# Altium PCB PCB1.PcbDoc
Units mm, origin at the board's own origin, x right, y up, seen from the top; angles counter-clockwise.
Board outline 90 x 60 mm, 2 copper layers (Top Layer, Bottom Layer); 43 components, 28 nets, 115 pads, 11 vias.
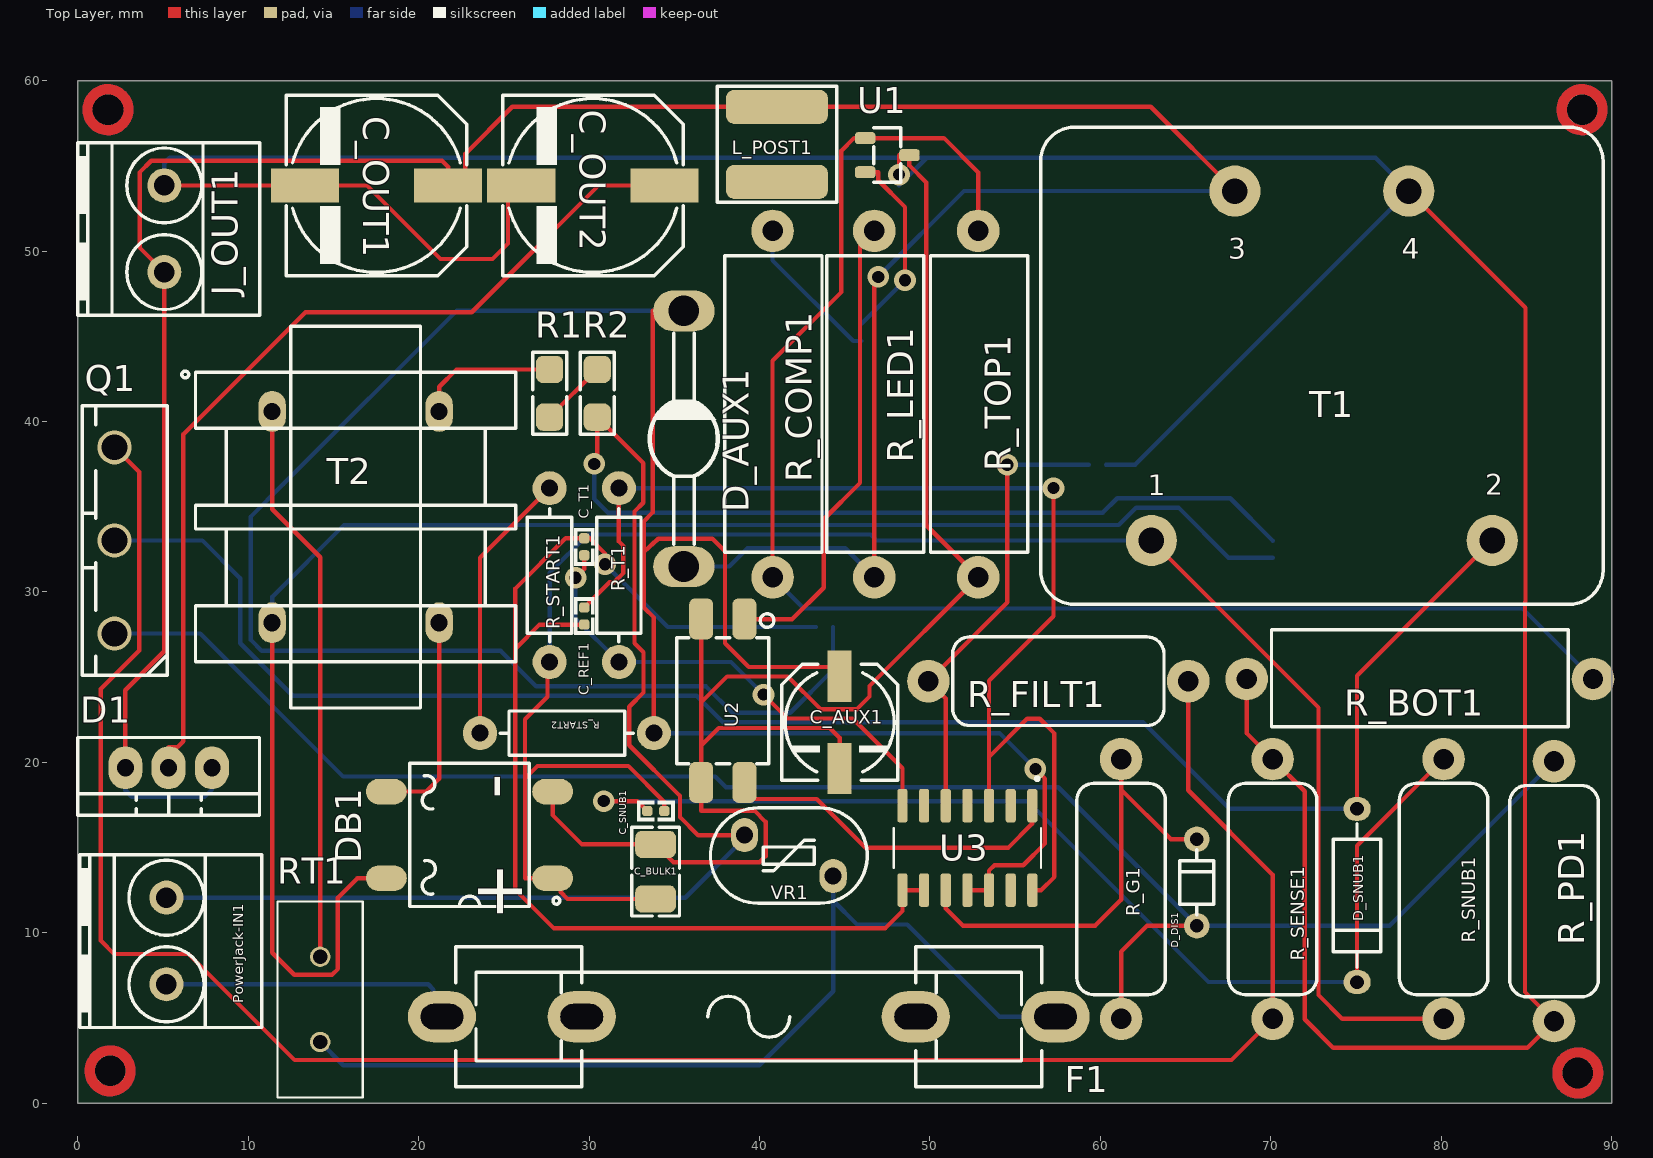
[diagram p0: Top Layer view]
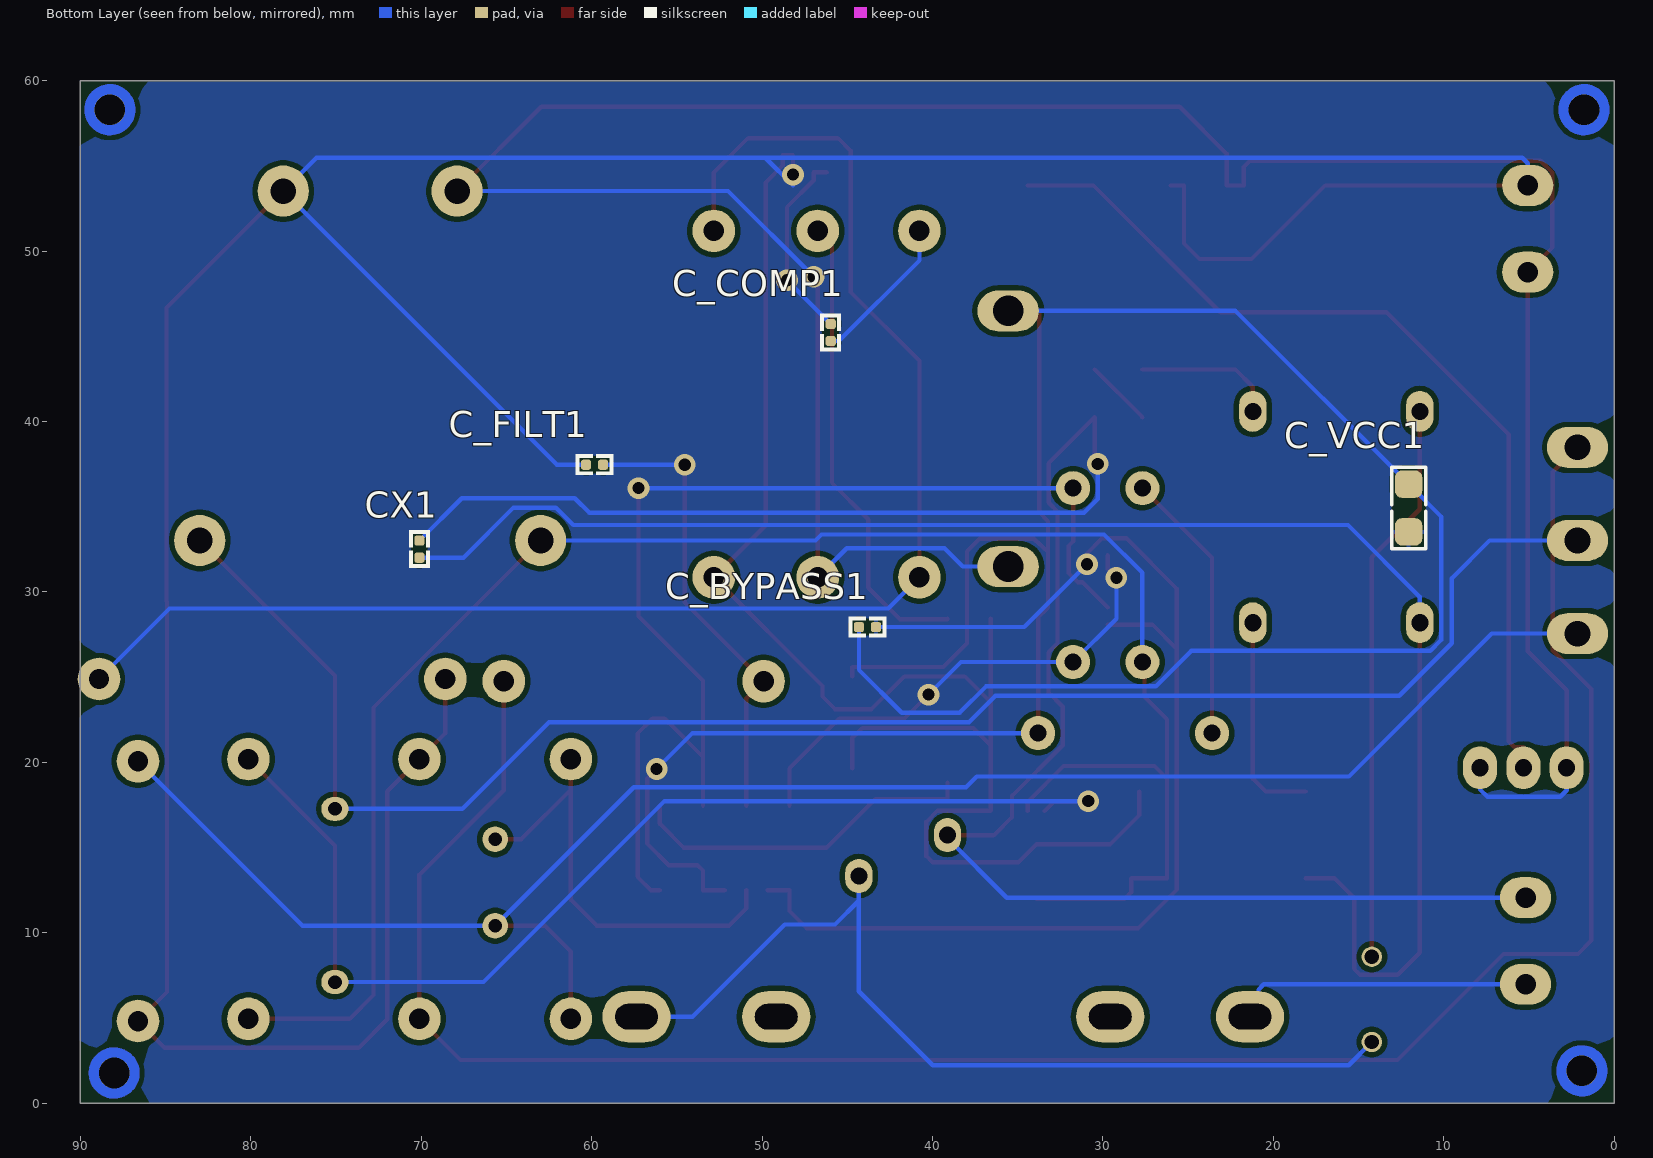
[diagram p1: Bottom Layer view, seen from below]
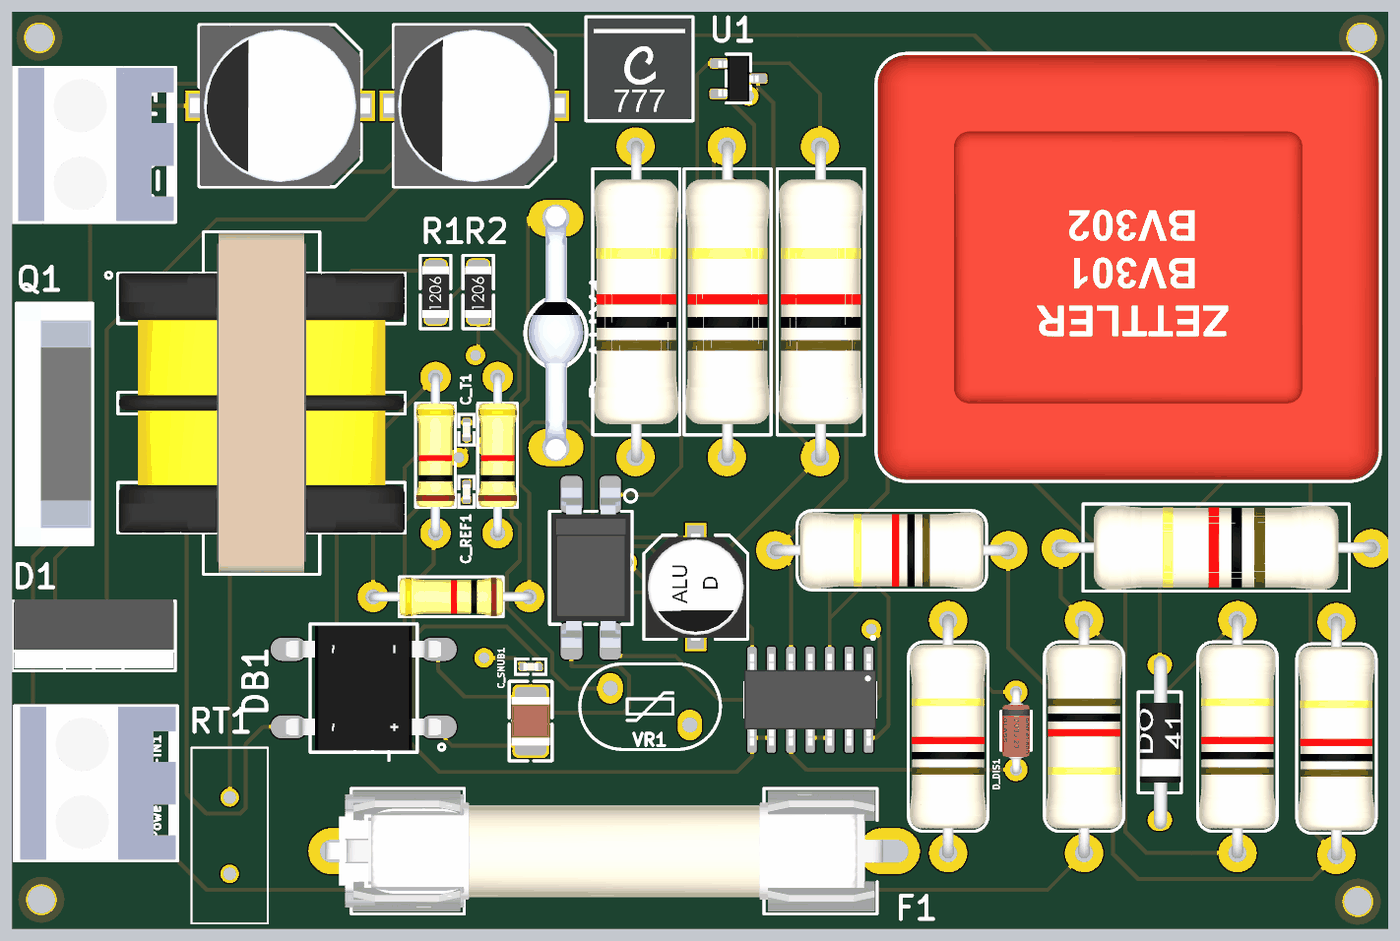
[diagram p2: 3D render of the assembled board from above, using the file's embedded part models]
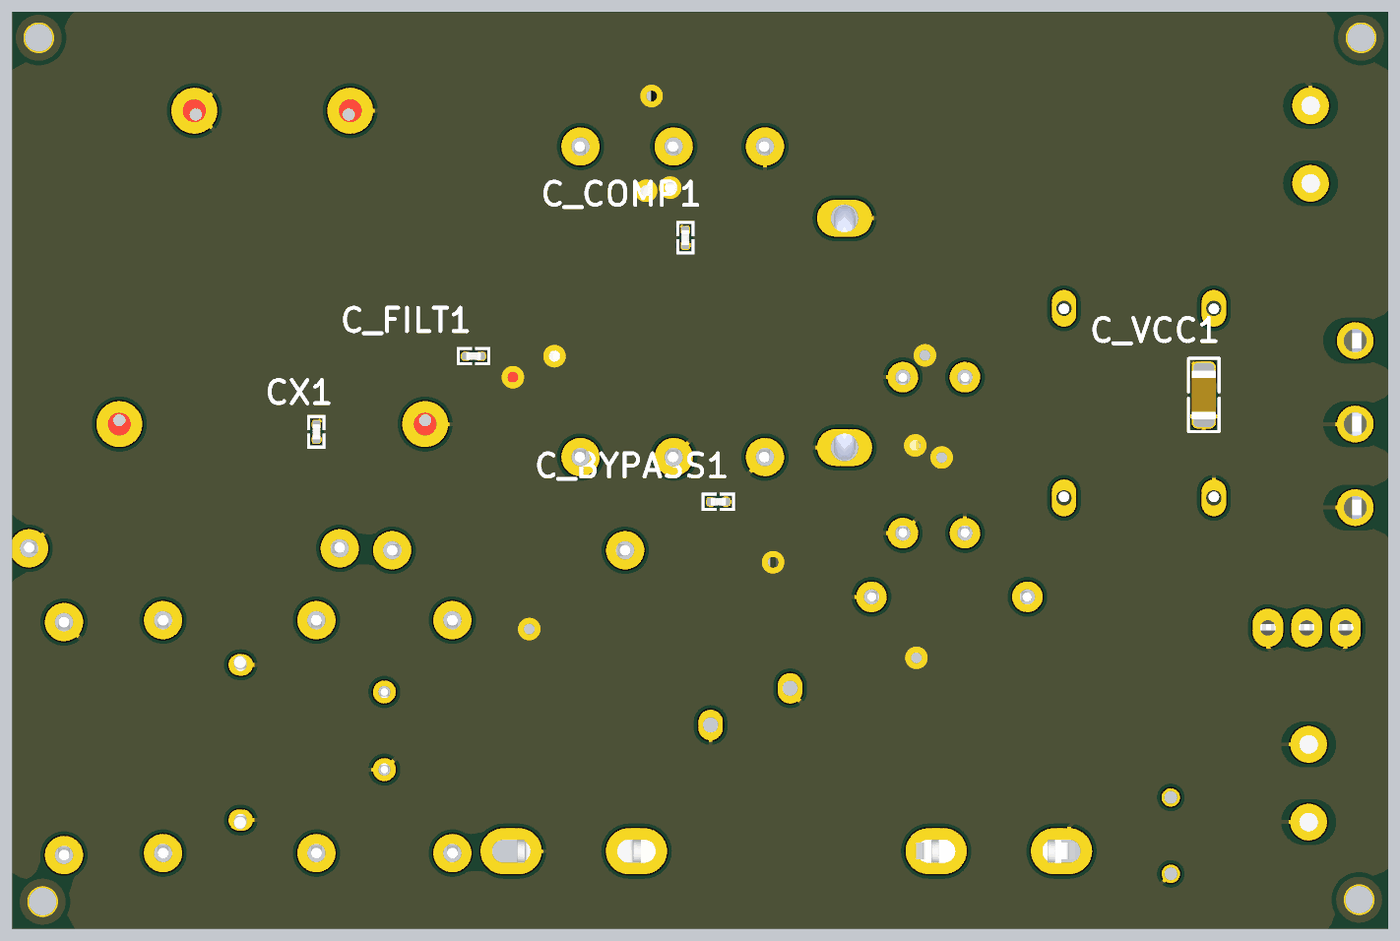
[diagram p3: 3D render of the assembled board from below, using the file's embedded part models]

## Layer stack, top to bottom
Top Solder: solder mask 0.0102, Solder Resist, Dk 3.5
Top Layer: signal copper 0.0356
Dielectric 1: dielectric 0.32, FR-4, Dk 4.8
Bottom Layer: signal copper 0.0356
Bottom Solder: solder mask 0.0102, Solder Resist, Dk 3.5

## Board outline
0,0 0,60 90,60 90,0

## Design rules (kind name [scope] priority, off if disabled: settings)
Clearance Clearance_1 [All] p1: gap=0.3 ignorepadtopadclearanceinfootprint=FALSE
Clearance Clearance_Isolation [InNet('PRI_GND') or InNet('DC_BUS') or InNet('AC_L') or InNet('AC_N') vs InNet('SEC_GND') or InNet('+12V_OUT')] p2: gap=6.5 ignorepadtopadclearanceinfootprint=FALSE
PolygonConnect [All] p1: connectstyle=Relief reliefconductorwidth=0.254 reliefentries=4 polygonreliefangle="90 Angle" airgapwidth=0.254
RoutingVias [All] p1: holewidth=0.711 width=1.27 viastyle="Through Hole" minholewidth=0.711 minwidth=1.27 maxholewidth=0.711 maxwidth=1.27
SolderMaskExpansion [All] p1: expansion=0.102 istentingtop=FALSE
SupplyNets "Schematic Supply Nets" [InNet('GND')] p1: voltage=0.000
Width Width_1 [All] p1: maxlimit=0.254 minlimit=0.254 preferedwidth=0.254
Width Width_Power [InNet('DC_BUS') or InNet('PRI_GND') or InNet('SEC_GND') or InNet('+12V_OUT') or InNet('Drain')] p2: maxlimit=2 minlimit=0.8 preferedwidth=1.2 minimp=50.000000 maximp=50.000000 favimp=50.000000
30 further rules are at their usual default settings.

## Components (designator, comment, footprint, x,y, rotation, side; value= is the part's Value field where it differs from the comment)
C_AUX1 "22uF" C_EL_D6L5 44.704,22.352 r270 top
C_BULK1 "0.68uF" C1210 33.909,13.589 r90 top
C_BYPASS1 "0.1uF" C0402 43.815,27.94 r180 bottom
C_COMP1 "0.1uF" C0402 45.974,45.22 r90 bottom
C_FILT1 "470pF" C0402 59.825,37.465 r180 bottom
C_OUT1 "470uF" C_EL_D10L10 17.526,53.848 r180 top
C_OUT2 "470uF" C_EL_D10L10 30.226,53.848 r180 top
C_REF1 "0.1uF" C0402 29.718,28.583 r270 top
C_SNUB1 "2200pF" C0402 33.917,17.145 r180 top
C_T1 "2.2nF" C0402 29.718,32.647 r270 top
C_VCC1 "22uF" C1206 12.065,34.925 r270 bottom
CX1 "0.1uF" C0402 70.104,32.512 r270 bottom
D1 "MBR20100" TO220_3 5.334,19.685 r180 top
D_AUX1 "BYW172" D_AX06_SOD64 35.56,38.989 r90 top
D_DIS1 "1N4148" D_AX02_DO35 65.659,12.954 r90 top
D_SNUB1 "FR107" D_AX04_DO41 75.057,12.192 r270 top
DB1 "MB10" DBRG_DIPSMD 22.987,15.748 r180 top
F1 "FUSE30A, 125V" FUSH_6X32MM_4PIN 39.37,5.08 r0 top
J_OUT1 "CONN_TB2" TBG_2 5.08,51.308 r90 top
L_POST1 "2.2uH" L_6 41.021,56.261 r270 top
PowerJack-IN1 "CONN_TB2" TBG_2 5.207,9.525 r90 top
Q1 "APT94N65" TO247_3 2.159,33.02 r90 top
R1 "470K" R1206 27.686,41.656 r90 top
R2 "470K" R1206 30.48,41.656 r90 top
R_BOT1 "2.61K" R2W_AX08 78.74,24.892 r180 top
R_COMP1 "10K" R2W_AX08 40.767,41.021 r90 top
R_FILT1 "1K" R1W_AX06 57.531,24.765 r180 top
R_G1 "22" R1W_AX06 61.214,12.573 r90 top
R_LED1 "1K" R2W_AX08 46.736,41.021 r90 top
R_PD1 "10K" R1W_AX06 86.614,12.446 r90 top
R_SENSE1 "0.33" R1W_AX06 70.104,12.573 r270 top
R_SNUB1 "68K" R1W_AX06 80.137,12.573 r90 top
R_START1 "150K" R025W_AX04 27.686,30.988 r90 top
R_START2 "150K" R025W_AX04 28.702,21.717 r180 top
R_T1 "10K" R025W_AX04 31.75,30.988 r90 top
R_TOP1 "10K" R2W_AX08 52.832,41.021 r90 top
RT1 "B57236S0509M000" THRMRB500W60L1150T500H1600 14.224,6.096 r90 top
T1 "2P2S" "Transformer 4 Leads" 72.992,43.27 r0 top
T2 "CMC1" CMCHOKE_UU16 16.309,34.394 r0 top
U1 "TL431" SOT23_3 47.498,55.626 r0 top
U2 "EL817" DIP_4SMD 37.846,23.622 r270 top
U3 "UC3843ADG4" SOIC127P600X175-14N 52.197,14.986 r270 top
VR1 "VDR7D110" MOV_7D 41.723,14.535 r0 top

## Footprints (in the part's own frame and the unit in brackets; to place one, negate y for a bottom-side part, rotate by r counter-clockwise, add the part's x,y. Pads: shape width x height; smd on the part's side, far side on the other; paste and mask are expansions set on the pad)
C0402 [mm] "CHIP Capacitor, 1.0X0.5mm, 0402"
  rrect50% 0.6x0.6 smd paste-1 mask+0.05: 1(-0.5,0) 2(0.5,0)
  silkscreen extent -1.1,-0.6 1.1,0.6, body extent -0.5,-0.27 0.5,0.27, height 0.36
C1206 [mm] "CHIP Capacitor, 3.2X1.6mm, 1206"
  rrect50% 1.6x1.6 smd paste-0.8 mask+0.075: 1(-1.4,0) 2(1.4,0)
  Top Layer pour cut-out: -0.8,1 -0.8,-1 0.8,-1 0.8,1
  silkscreen extent -2.4,-1 2.4,1, body extent -1.6,-0.8 1.6,0.8, height 1
C1210 [mm] "CHIP Capacitor, 3.2X2.5mm, 1210, 3225"
  rrect50% 1.6x2.4 smd paste-0.157 mask+0.075: 1(-1.6,0) 2(1.6,0)
  Top Layer pour cut-out: -0.8,1.3 -0.8,-1.3 0.8,-1.3 0.8,1.3
  silkscreen extent -2.6,-1.4 2.6,1.4, body extent -1.6,-1.25 1.6,1.25, height 1
C_EL_D6L5 [mm] "Electrolytic Cap, D: 6.3mm L: 5.4mm, Size D"
  rect 3x1.4 smd paste-0.154: 1(-2.7,0) 2(2.7,0)
  Top Layer pour cut-out: 1.905,3.175 1.905,-3.175 -1.905,-3.175 -1.905,3.175
  silkscreen extent -3.4,-3.4 3.4,3.4, body extent -3.5,-3.3 3.5,3.3, height 5.4
C_EL_D10L10 [mm] "Electrolytic Cap, 10.3mm, L: 10mm"
  rect 4x2 smd paste-0.215: 1(-4.2,0) 2(4.2,0)
  Top Layer pour cut-out: -3.556,5.08 -3.556,-5.08 3.556,-5.08 3.556,5.08
  silkscreen extent -5.3,-5.3 5.3,5.3, body extent -5.9,-5.25 5.9,5.25, height 10.5
CMCHOKE_UU16 [mm] "COMMON MODE CHOKE, UU16, UT2024"
  oval 1.6x2.4 hole 1: 1(-4.9,6.2) 2(-4.9,-6.2) 3(4.9,-6.2) 4(4.9,6.2)
  silkscreen extent -10.2,-11.2 9.4,11.2, body extent -9.35,-11.1 9.35,11.13, height 25.65
D_AX02_DO35 [mm] "DIODE 0.2 INCH SPACING DO-35, 1N4148"
  round 1.5 hole 0.8: 1(-2.54,0) 2(2.54,0)
  silkscreen extent -1.91,-1 1.93,1, body extent -2.81,-0.9 2.81,0.9, height 1.82
D_AX04_DO41 [mm] "DIODE 0.4 INCH SPACING DO-41"
  oval 1.4x1.6 hole 0.8: 1(-5.08,0) 2(5.08,0)
  silkscreen extent -4.2,-1.4 4.2,1.4, body extent -5.68,-1.32 5.68,1.4, height 2.85
D_AX06_SOD64 [mm] "DIODE 0.6 INCH SPACING SOD-64"
  oval 2.4x3.6 hole 1.8: 1(-7.5,0) 2(7.5,0)
  silkscreen extent -6.2,-2 6.2,2, body extent -8.29,-1.81 8.3,1.81, height 3.82
DBRG_DIPSMD [mm] "BRIDGE RECTIFIER, pitch: 5.08mm, 8X6mm, DB-S, DF005S"
  oval 2.4x1.5 smd: 1(-4.88,2.54) 2(-4.88,-2.54) 3(4.88,-2.54) 4(4.88,2.54)
  silkscreen extent -5.3,-4.2 3.5,4.2, body extent -5.08,-4.05 5.07,4.05, height 2.7
DIP_4SMD [mm] "DIP4, pitch 2.54mm, 300mil Width SMD"
  rrect50% 2.4x1.4 smd: 1(-4.8,1.27) 2(-4.8,-1.27) 3(4.8,-1.27) 4(4.8,1.27)
  silkscreen extent -5.1,-2.7 3.7,3, body extent -5.23,-2.55 5.23,2.55, height 4.6
FUSH_6X32MM_4PIN [mm] "PCB Fuse Holder 6x32mm 2 PIN, pitch: 15.0mm  24x9mm"
  oval 4x3 hole 1.5 slot 2.5 at 0 deg: 1(-18,0) 2(18,0) ""(-9.8,0) ""(9.8,0)
  silkscreen extent -17.2,-4.1 17.2,4.1, body extent -18.9,-3.95 17.6,3.95, height 11.19
L_6 [mm] "INDUCTOR, 6.0X6.0mm, SRP6030, XAL6030"
  rrect50% 2x6 smd paste-0.2: 1(-2.2,0) 2(2.2,0)
  silkscreen extent -3.4,-3.5 3.4,3.5, body extent -3.28,-3.38 3.28,3.38, height 3.1
MOV_7D [mm] "VDR, VARISTOR, 9X5.6, pitch: 5.0mm, 275VAC(RMS)"
  oval 1.6x2 hole 1: 1(-2.6,1.2) 2(2.6,-1.2)
  silkscreen extent -4.6,-2.8 4.6,2.8, body extent -4.49,-2.8 4.49,2.8, height 12.5
R1W_AX06 [mm] "RESISTOR 1 WATT, AXIAL0.6"
  round 2.5 hole 1.2: 1(-7.62,0) 2(7.62,0)
  silkscreen extent -6.2,-2.6 6.2,2.6, body extent -7.97,-2.49 7.97,2.51, height 5
R2W_AX08 [mm] "RESISTOR 2 WATT, AXIAL0.8"
  round 2.5 hole 1.2: 1(-10.16,0) 2(10.16,0)
  silkscreen extent -8.7,-2.9 8.7,2.8, body extent -10.51,-2.8 10.51,2.7, height 5.5
R025W_AX04 [mm] "RESISTOR 1/4 WATT, AXIAL0.4"
  round 2 hole 1: 1(-5.1,0) 2(5.1,0)
  silkscreen extent -3.9,-1.3 3.9,1.3, body extent -5.38,-1.28 5.38,1.28, height 2.6
R1206 [mm] "CHIP RESISTOR 1/4 WATT, Body 3.2x1.6mm,1206, 3216"
  rrect50% 1.6x1.6 smd paste-0.8 mask+0.075: 1(-1.4,0) 2(1.4,0)
  Top Layer pour cut-out: -0.8,1 -0.8,-1 0.8,-1 0.8,1
  silkscreen extent -2.4,-1 2.4,1, body extent -1.67,-0.86 1.68,0.87, height 0.85
SOIC127P600X175-14N [mm]
  rrect50% 1.97x0.6 smd paste+0 mask+0.102: 1(-2.475,3.81) 2(-2.475,2.54) 3(-2.475,1.27) 4(-2.475,0) 5(-2.475,-1.27) 6(-2.475,-2.54) 7(-2.475,-3.81) 8(2.475,-3.81) 9(2.475,-2.54) 10(2.475,-1.27) 11(2.475,0) 12(2.475,1.27) 13(2.475,2.54) 14(2.475,3.81)
  silkscreen extent -4.15,-4.33 1.17,4.33, body extent -3,-4.33 3,4.33, height 1.75
SOT23_3 [mm] "SOT-23, Micro3, MO-178, TO-236AB, MO-193C, SuperSOT3, SC-59, 1.5x3mm, Pitch 1.9mm"
  rrect50% 1.2x0.7 smd paste-0.05 mask+0.1: 1(-1.3,1) 2(-1.3,-1) 3(1.3,0)
  silkscreen extent -0.8,-1.6 0.8,1.6, body extent -1.32,-1.5 1.32,1.5, height 1.08
TBG_2 [mm] "Terminal Block Green"
  round 2 / inner round 2 / far side oval 2.4x3 hole 1.2: 1(-2.54,0) 2(2.54,0)
  silkscreen extent -5.08,-5.6 5.05,5.08, body extent -5,-5.5 5,5, height 14
THRMRB500W60L1150T500H1600 [mm]
  round 1.2 hole 0.85: 1(-2.5,0) 2(2.5,0)
  silkscreen extent -5.75,-2.5 5.75,2.5
TO220_3 [mm] "TO-220 3 LEAD, TO-262, pitch: 2.54mm  10x4.5mm"
  oval 2x2.5 hole 1: 1(-2.54,0) 2(0,0) 3(2.54,0)
  silkscreen extent -5.33,-1.78 5.33,2.79, body extent -5.2,-1.85 5.2,2.65, height 19
TO247_3 [mm] "TO247, TO-247, TO-3P pitch: 5.5mm 16x5mm, TO-218"
  round 2 / inner round 2 / far side oval 2.4x3.6 hole 1.5: 1(-5.461,0) 2(0,0) 3(5.461,0)
  silkscreen extent -7.9,-3.1 7.9,1.9, body extent -7.8,-3 7.8,1.8, height 23.9
"Transformer 4 Leads" [mm] "Sealed Transformer - 4 Leads"
  round 3 hole 1.5: 1(-10,-10.25) 2(10,-10.25) 3(-5.1,10.25) 4(5.1,10.25)
  silkscreen extent -16.5,-14 16.5,14, body extent -16.4,-13.9 16.4,13.9, height 15.5

## Part data
C_AUX1: library part CAP_SMD_EL_22uF_50v, "CAP, SMD, ELEC,", ASSEMBLY=ASSEMBLY, DESC=DESCRIPTION, DIST#=MOUSER, MANF=MANF, MANF_P#=MANF_PART#, PARAM=20%, PARAM2=50v, PRICE="10= -$"
C_BULK1: library part CAP_SMD_MLCC_68n1kv, "CAP, MLCC", MANF=KEMET, MANF_P#=C1210W683KDRACTU, PARAM="X7R, 10%, -55~125oC", PARAM2=1000V, PRICE=1$
C_BYPASS1 C_REF1 CX1: library part CAP_SMD_MLCC_100n50T, "CAP, MLCC, 100nF, 50V, X5R, 10%, 0402C", ASSEMBLY=ASSEMBLY, MANF="Taiyo Yuden", MANF_P#=UMK105BJ104KV-F, PARAM="X5R, 10%, -55~85oC", PARAM2=50V, PRICE="100= 3.8$"
C_COMP1: library part CAP_SMD_MLCC_100n35T, "CAP, MLCC, 100nF, 35V, X5R, 10%, 0402C", ASSEMBLY=ASSEMBLY, MANF="Taiyo Yuden", MANF_P#=GMK105BJ104KV-F, PARAM="X5R, 10%, -55~85oC", PARAM2=35V, PRICE="100= 4$"
C_FILT1: library part CAP_SMD_MLCC_470p50V, "CAP, MLCC, 50V, C0G, 5%", ASSEMBLY=ASSEMBLY, DESC="CAP, MLCC", DIST#=MOUSER, MANF=MURATA, MANF_P#=GCM1555C1H471JA16J, PARAM="C0G, 5%", PARAM2=50V, PRICE="100= 2$"
C_OUT1 C_OUT2: library part CAP_SMD_EL_470uF_35v, "CAP, SMD, ELEC,", ASSEMBLY=ASSEMBLY, DESC=DESCRIPTION, DIST#=MOUSER, MANF=MANF, MANF_P#=MANF_PART#, PARAM=20%, PARAM2=35v, PRICE="10= -$"
C_SNUB1 C_T1: library part CAP_SMD_MLCC_2.2n50V, "CAP, MLCC", ASSEMBLY=ASSEMBLY, MANF=Murata, MANF_P#=GCM155R71H222JA37D, PARAM="X7R, 5%, -55~125oC", PARAM2=50V, PRICE="100= 2$"
C_VCC1: library part CAP_SMD_MLCC_22u35V, "CAP, MLCC, X5R 22uF 35V 20% 1206", DESC="CAP, MLCC, 22uF, 25V, X5R,  20%, 1206", MANF=TDK, MANF_P#=C3216X5R1V226M160AC, PARAM="X5R, 20%", PARAM2=35V, PRICE=1.2$
D1: library part DIODE_THD_SCHOTTKY_MBR20100, "DIODE, SCHOTTKY, DUAL, 100V, 20A", ASSEMBLY=ASSEMBLY, DESC=DESCRIPTION, MANF=Diodes, MANF_P#=MBR20100, PARAM=20A, PARAM2=100V, PRICE=PRICE
D_AUX1: library part DIODE_THD_BYW172, "DIODE, FAST", ASSEMBLY=ASSEMBLY, DESC=DESCRIPTION, MANF=VISHAY, MANF_P#=BYW172, PARAM=200V, PARAM2=3A, PRICE=PRICE
D_DIS1: library part DIODE_THD_1N4148_DO35, "DIODE, FAST SWTICHING, THD", ASSEMBLY=ASSEMBLY, DESC=DESCRIPTION, MANF=MANF, MANF_P#=1N4148, PARAM=75V, PARAM2=0.3A, PRICE=PRICE
D_SNUB1: library part DIODE_THD_1N4002, "DIODE, GENERAL PURPOSE, 100V/1A", ASSEMBLY=ASSEMBLY, DESC=DESCRIPTION, MANF=MANF, MANF_P#=1N4002, PARAM=100V, PARAM2=1A, PRICE=PRICE
DB1: library part DIODE_SMD_BRIDGE_MB10, "DIODE, BRIDGE, SMD", MANF="MCC, DIODES", MANF_P#="MB10F, MB10S", PARAM=0.5A, PARAM2=1000V
F1: library part FUSE_6X32, "Fuse HOLDER 5X20", MANF=MANF, MANF_P#=MANF_PART#, PARAM=30A, PARAM2=125VAC
J_OUT1 PowerJack-IN1: "CONN, TERMINAL BLOCK, 5.08mm pitch"
L_POST1: library part IND_SMD_2.2uH_3.75A, "INDUCTOR, 2.2uH 3.75A, 20mOhm", ASSEMBLY=ASSEMBLY, MANF=LARID, MANF_P#=TYS60282R2N-10, PARAM="3.75A Irms, 5.1A Isat, -40~125oC", PARAM2=20mOhm, PRICE=0.34$
Q1: library part MOSN_APT94N65_TO247, "MOSFET N-CH, 650V, 94A, 300mRDS", ASSEMBLY=ASSEMBLY, MANF=MICROSEMI, MANF_P#=APT94N65, PARAM="94A, 300mRDS, -55~150°C", PARAM2="650V, 5200pF", PRICE=70t@PAYA
R1 R2: library part RES_SMD_1206, "RESISTOR, SMD", ASSEMBLY=ASSEMBLY, DESC=DESCRIPTION, DIST#=MOUSER, MANF=-, MANF_P#=-, PARAM="1%, 0.25W", PARAM2=-, PRICE=-
R_BOT1 R_COMP1 R_FILT1 R_G1 R_LED1 R_PD1 R_SENSE1 R_SNUB1 R_START1 R_START2 R_T1 R_TOP1: library part RES_THD, "RESISTOR, THD", ASSEMBLY=ASSEMBLY, DESC=DESCRIPTION, DIST#=MOUSER, MANF="KOA SPEER", MANF_P#=RK73H1ETTP4701F, PARAM=0.063W, PARAM2=1%, PRICE="100= 0.5$"
RT1: "ICL 5 OHM 20% 4.5A 11.5MM", Package=None, Check_prices=https://www.snapeda.com/parts/B57236S0509M000/TDK/view-part/?ref=eda, MF="EPCOS - TDK Electronics", MP=B57236S0509M000, SnapEDA_Link=https://www.snapeda.com/parts/B57236S0509M000/TDK/view-part/?ref=snap
T1: library part "Transformer 2P2S", "Transformer 2 Primary , 2 Secondry", Package="Transformer 4 Leads", Power=100W, Voltage Ratio=220:9, MF=Zettler, MP="Transformer 2P2S", Publisher="Majid Derhambakhsh"
T2: library part EMI_TRANS_CMCHOKE_UU16, "Choke, Common Mode, UU16", MANF=-, MANF_P#=UU16, PARAM=-, PRICE=-
U1: library part TL431_SOT23, "VREF, Programmable Precision", Package=SOT23-3, MANF_P#=TL431_SOT23
U2: library part OPTC_TR4P_EL817_SMD, "OPTOCOUPLER, TRANSISTOR, 4PIN", Package=DIP-4SMD, PARAM=IF=5mA, PARAM2="VCE = 5V", PRICE=300t@Paya
U3: "30-V, 1A, 500KHz current mode PWM controller with 8.4V/7.6V UVLO 100% duty cycle 0C to 70C 14-SOIC 0 to 70", Package="SOIC-14 Texas Instruments", Check_prices=https://www.snapeda.com/parts/UC3843ADG4/Texas+Instruments/view-part/?ref=eda, MF="Texas Instruments", MP=UC3843ADG4, SnapEDA_Link=https://www.snapeda.com/parts/UC3843ADG4/Texas+Instruments/view-part/?ref=snap
VR1: library part VARISTOR_B72207S011_MOV7, "Varistor, 14VDC/11VAC, MOV7", MANF="EPCOS / TDK", MANF_P#=B72207S0110K211, PARAM="250A-ITM, -40~85oC", PARAM2="14VDC, 11VAC, 36VCLAMP", PRICE=0.45$

## Free pads (board coordinates)
  round 1.8 hole 1.8: 5(1.778,58.293) 5(1.905,1.905) 5(88.011,1.778) 5(88.265,58.293)

## Via types
v1: diameter 1.27, hole 0.711, Top Layer to Bottom Layer, 11 vias

## Nets (pads, with @x,y where several pads share a name; then routed paths per layer and width w, separated by ;. In a path a pad name is that pad's centre, name@x,y a point inside that pad or via, vN(x,y) a via of type N, cw(c..) or ccw(c..) an arc to the next point about the centre after c; other vN are vias at no path point)
AC_L: F1.1 PowerJack-IN1.1 | length 17.9
  Bottom Layer w0.254: PowerJack-IN1.1 20.561,6.985 20.879,6.667 20.879,5.08 F1.1
AC_N: CX1.1 PowerJack-IN1.2 R2.1 VR1.1 | length 112.8
  Top Layer w0.254: v1(30.302,37.516) 30.48,37.694 R2.1 33.177,37.559 33.177,35.234 32.664,34.722 32.664,26.992 33.198,26.458 33.198,24.105 32.36,23.266 32.36,21.006 35.331,18.034 35.331,16.789 36.398,15.723 39.123,15.723 VR1.1
  Bottom Layer w0.254: PowerJack-IN1.2 35.643,12.065 39.123,15.545 VR1.1 ; v1(30.302,37.516) 30.302,35.458 31.115,34.646 60.13,34.646 60.985,35.501 67.615,35.501 CX1.1
DC_BUS: C_BULK1.1 C_SNUB1.1 DB1.1 R_SNUB1.1 R_START1.1 T1.1 | length 112.2
  Top Layer w0.254: R_START1.1 27.559,25.888 27.559,23.851 26.238,22.53 26.238,19.05 ; C_BULK1.1 28.74,11.989 28.346,12.383 28.346,13.208 DB1.1 26.238,13.208 26.238,19.05 ; C_SNUB1.1 34.417,17.678 32.309,19.787 26.975,19.787 26.238,19.05 ; T1.1 72.796,23.216 72.796,6.35 74.193,4.953 R_SNUB1.1
  Bottom Layer w0.254: R_START1.1 27.686,31.121 29.935,33.371 46.512,33.371 46.863,33.02 T1.1
DRAIN_NODE: D_SNUB1.1 Q1.2 T1.2 | length 100.7
  Top Layer w0.254: D_SNUB1.1 75.057,25.085 T1.2
  Bottom Layer w0.254: Q1.2 7.315,33.02 9.539,30.796 9.539,26.986 12.618,23.907 36.31,23.907 37.856,22.362 62.5,22.362 67.589,17.272 D_SNUB1.1
GND: C_BYPASS1.2 C_REF1.2 C_T1.1 C_VCC1.2 U3.8 U3.9 | length 70.3
  Top Layer w0.254: C_REF1.2 27.092,28.083 25.679,26.67 ; v1(30.937,31.623) 30.937,32.258 30.048,33.147 C_T1.1 28.626,33.147 25.679,30.201 25.679,26.67 ; U3.8 U3.8@48.387,12.497 ; U3.9 49.657,12.497 U3.8@48.387,12.497 ; 25.679,26.67 25.679,12.522 27.94,10.262 47.371,10.262 48.387,11.278 U3.8@48.387,12.497
  Bottom Layer w0.254: v1(30.937,31.623) 34.62,27.94 C_BYPASS1.2
NetC_AUX1_1: C_AUX1.1 C_BYPASS1.1 C_VCC1.1 D_AUX1.2 R_START2.1 U3.11 U3.12 | length 157
  Top Layer w0.254: R_START2.1 33.802,28.499 33.223,29.078 33.223,32.366 ; D_AUX1.2 33.731,46.489 33.731,34.661 33.223,34.153 33.223,32.366 ; C_AUX1.1 44.704,25.594 39.37,25.594 37.973,26.991 37.973,32.385 37.236,33.122 34.061,33.122 33.223,32.366 ; U3.11 52.197,12.497 53.467,12.497 U3.12 53.467,13.652 53.785,13.97 55.474,13.97 56.744,15.24 56.744,19.05 v1(56.185,19.609)
  Bottom Layer w0.254: R_START2.1 54.077,21.717 v1(56.185,19.609) ; D_AUX1.2 22.229,46.489 C_VCC1.1 10.16,34.42 10.16,27.178 10.795,26.543 24.816,26.543 26.898,24.461 36.864,24.461 38.41,22.916 41.804,22.916 44.315,25.427 C_BYPASS1.1
NetC_COMP1_1: C_COMP1.1 R_COMP1.2 | length 8.9
  Bottom Layer w0.254: R_COMP1.2 40.767,49.454 45.501,44.72 C_COMP1.1
NetC_COMP1_2: C_COMP1.2 U1.2 | length 11.4
  Top Layer w0.254: U1.2 46.965,54.626 46.965,54.153 48.539,52.578 v1(48.539,48.285)
  Bottom Layer w0.254: C_COMP1.2 v1(48.539,48.285)
NetC_FILT1_2: C_FILT1.2 R_FILT1.2 U3.5 | length 27.1
  Top Layer w0.254: U3.5 50.927,23.749 R_FILT1.2 54.534,29.388 v1(54.534,37.465)
  Bottom Layer w0.254: v1(54.534,37.465) C_FILT1.2
NetC_OUT1_1: C_OUT1.1 D1.1 D1.3 D_AUX1.1 J_OUT1.1 L_POST1.1 R_LED1.1 T1.3 | length 168.4
  Top Layer w0.254: D1.3 2.794,24.232 5.08,26.518 J_OUT1.1 3.632,50.216 3.632,54.61 4.318,55.296 21.374,55.296 21.742,54.927 C_OUT1.1@21.742,53.848 ; C_OUT1.1 C_OUT1.1@21.742,53.848 ; R_LED1.1 46.736,48.26 v1(46.965,48.489) ; T1.3 62.951,58.461 L_POST1.1 25.492,58.461 22.733,55.702 22.733,53.848 C_OUT1.1@21.742,53.848
  Bottom Layer w0.254: D1.3 2.794,18.364 3.175,17.983 7.442,17.983 7.874,18.415 D1.1 ; D_AUX1.1 38.22,31.489 39.294,32.563 45.034,32.563 R_LED1.1 ; v1(46.965,48.489) 51.996,53.52 T1.3
NetC_OUT2_1: C_OUT2.1 D1.2 | length 54.5
  Top Layer w0.254: D1.2 5.334,20.904 5.867,20.904 6.198,21.234 6.198,39.243 13.36,46.406 23.114,46.406 30.556,53.848 C_OUT2.1
NetC_REF1_1: C_REF1.1 R_T1.2 U3.3 U3.14 | length 69.1
  Top Layer w0.254: C_REF1.1 31.203,30.568 31.468,30.568 32.015,31.115 32.015,32.692 31.75,32.957 R_T1.2 ; U3.3 53.467,20.32 ; U3.14 56.007,12.497 56.515,12.497 57.302,13.284 57.302,21.692 56.439,22.555 55.702,22.555 53.467,20.32 ; v1(57.252,36.088) 57.252,28.575 53.467,24.79 53.467,20.32
  Bottom Layer w0.254: R_T1.2 v1(57.252,36.088)
NetC_SNUB1_2: C_SNUB1.2 D_SNUB1.2 R_SNUB1.2 | length 66.6
  Top Layer w0.254: v1(30.861,17.729) 32.833,17.729 C_SNUB1.2 ; D_SNUB1.2 75.057,15.113 R_SNUB1.2
  Bottom Layer w0.254: v1(30.861,17.729) 55.728,17.729 66.345,7.112 D_SNUB1.2
NetC_T1_2: C_T1.2 R_T1.1 U3.7 | length 28.9
  Top Layer w0.254: v1(29.21,30.836) 29.718,31.344 C_T1.2 ; v1(40.234,23.978) 41.64,22.571 45.476,22.571 48.387,19.66 U3.7
  Bottom Layer w0.254: v1(29.21,30.836) 29.21,28.428 R_T1.1 38.323,25.888 v1(40.234,23.978)
NetCX1_2: CX1.2 DB1.4 T2.2 | length 95
  Top Layer w0.254: T2.2 11.409,8.835 12.7,7.544 14.922,7.544 15.265,7.887 15.265,12.065 16.408,13.208 DB1.4
  Bottom Layer w0.254: T2.2 11.409,29.71 15.624,33.925 61.077,33.925 62.1,34.947 64.583,34.947 67.518,32.012 CX1.2
NetD_DIS1_1: D_DIS1.1 Q1.1 R_G1.1 R_PD1.2 | length 104.6
  Top Layer w0.254: R_G1.1 61.214,8.89 62.738,10.414 D_DIS1.1
  Bottom Layer w0.254: Q1.1 7.188,27.559 15.57,19.177 37.398,19.177 38.033,18.542 57.531,18.542 D_DIS1.1 76.962,10.414 R_PD1.2
NetD_DIS1_2: D_DIS1.2 R_G1.2 U3.10 | length 26.3
  Top Layer w0.254: U3.10 50.927,11.43 51.943,10.414 59.69,10.414 61.214,11.938 61.214,18.415 ; R_G1.2 61.214,18.415 ; D_DIS1.2 64.135,15.494 61.214,18.415
NetDB1_3: DB1.3 T2.3 | length 12.6
  Top Layer w0.254: DB1.3 20.447,18.288 21.209,19.05 T2.3
NetF1_2: F1.2 RT1.1 VR1.2 | length 55.1
  Bottom Layer w0.254: RT1.1 15.585,2.235 39.98,2.235 44.323,6.579 44.323,11.887 ; VR1.2 44.323,11.887 ; F1.2 54.077,5.08 48.666,10.49 45.72,10.49 44.323,11.887
NetQ1_3: Q1.3 R_FILT1.1 R_SENSE1.2 | length 125
  Top Layer w0.254: Q1.3 3.607,37.033 3.607,26.568 1.346,24.308 1.346,9.55 2.134,8.763 6.502,8.763 12.725,2.54 67.691,2.54 R_SENSE1.2 70.104,13.411 65.151,18.364 R_FILT1.1
NetR1_1: R1.1 R2.2 | length 4
  Top Layer w0.254: R1.1 30.48,43.05 R2.2
NetR1_2: R1.2 T2.4 | length 8.3
  Top Layer w0.254: T2.4 21.209,42.04 22.225,43.056 R1.2
NetR_BOT1_1: R_BOT1.1 R_COMP1.1 R_TOP1.2 U1.1 | length 89.9
  Top Layer w0.254: R_COMP1.1 40.767,43.561 44.806,47.6 44.806,55.88 45.552,56.626 U1.1 50.816,56.626 52.832,54.61 R_TOP1.2
  Bottom Layer w0.254: R_COMP1.1 42.596,29.032 84.76,29.032 R_BOT1.1
NetR_LED1_2: R_LED1.2 U2.1 | length 28.1
  Top Layer w0.254: U2.1 39.116,28.397 41.91,28.397 43.764,30.251 43.764,34.265 45.898,36.398 45.898,51.181 R_LED1.2
NetR_START1_2: R_START1.2 R_START2.2 | length 16.1
  Top Layer w0.254: R_START2.2 23.602,32.004 R_START1.2
NetRT1_2: RT1.2 T2.1 | length 33.2
  Top Layer w0.254: T2.1 11.409,34.849 14.224,32.034 RT1.2
NetU2_4: U2.4 U3.1 | length 20.7
  Top Layer w0.254: U2.4 39.116,17.856 43.358,17.856 46.228,14.986 54.585,14.986 56.007,16.408 U3.1
PRI_GND: C_AUX1.2 C_BULK1.2 C_FILT1.1 C_OUT1.2 C_OUT2.2 DB1.2 J_OUT1.2 R_BOT1.2 R_PD1.1 R_SENSE1.1 R_TOP1.1 T1.4 U1.3 U2.2 U2.3 | length 311.2
  Top Layer w0.254: J_OUT1.2 C_OUT1.2 16.967,53.848 21.285,49.53 24.333,49.53 25.248,50.444 25.248,53.848 C_OUT2.2 ; DB1.2 27.864,18.288 27.864,16.916 29.591,15.189 C_BULK1.2 34.951,14.148 40.005,14.148 40.361,14.503 40.361,16.51 39.7,17.17 36.576,17.17 U2.3 36.576,20.98 ; U2.2 36.576,23.516 ; C_AUX1.2 44.704,21.438 44.125,22.017 37.613,22.017 36.576,20.98 ; v1(48.184,54.483) 48.184,55.626 U1.3@48.793,55.626 ; U1.3 U1.3@48.793,55.626 ; R_BOT1.2 68.58,21.717 R_SENSE1.1 71.984,18.313 71.984,4.928 73.66,3.251 85.039,3.251 R_PD1.1 84.912,6.528 84.912,29.413 84.938,29.439 84.938,46.674 T1.4 ; 36.576,20.98 36.576,23.516 ; 36.576,23.516 38.1,25.04 41.662,25.04 43.577,23.125 45.72,23.125 46.457,23.862 46.457,24.486 R_TOP1.1 49.784,33.909 49.784,54.026 48.793,55.016 U1.3@48.793,55.626
  Bottom Layer w0.254: J_OUT1.2 5.08,55.156 5.397,55.474 49.809,55.474 ; v1(48.184,54.483) 48.184,53.848 49.809,55.474 ; C_FILT1.1 62.037,37.465 T1.4 76.138,55.474 49.809,55.474
pads on no net: F1. L_POST1.2 U3.2 U3.4 U3.6 U3.13
copper on no net: | length 37.7
  Top Layer w1.5: 2.528,58.293 ccw(c1.778,58.293) 2.528,58.293 ; 2.655,1.905 ccw(c1.905,1.905) 2.655,1.905 ; 88.761,1.778 ccw(c88.011,1.778) 88.761,1.778 ; 89.015,58.293 ccw(c88.265,58.293) 89.015,58.293
  Bottom Layer w1.5: 2.528,58.293 ccw(c1.778,58.293) 2.528,58.293 ; 2.655,1.905 ccw(c1.905,1.905) 2.655,1.905 ; 88.761,1.778 ccw(c88.011,1.778) 88.761,1.778 ; 89.015,58.293 ccw(c88.265,58.293) 89.015,58.293

## Polygon pours and split planes (outlines as drawn)
GND on Bottom Layer "GND_L02_P000" (solid, remove dead copper, pour order 0): 0,0 90.043,0 90.043,60.071 89.916,59.944 0,59.944

## Text inside footprints (layer, text, board x,y; h text height)
DB1: Top Overlay "+" at 23.487,14.148 h3 r270; Top Overlay "-" at 23.487,19.348 h3 r270
T1: Top Overlay "1" at 62.792,35.687 h1.2; Top Overlay "2" at 82.592,35.708 h1.2; Top Overlay "3" at 67.492,49.562 h1.2; Top Overlay "4" at 77.692,49.562 h1.2